# Altium PCB Karta_TETRA.PCBDOC (part 4 of 8)
Units mm, origin at the board's own origin, x right, y up, seen from the top; angles counter-clockwise.
Board outline 70 x 83.2 mm, 6 copper layers (TopLayer, Layer 1, Layer 2, Layer 3, Layer 4, Bottom Layer), stack 0.914 mm thick; 344 components, 222 nets, 1133 pads, 615 vias.
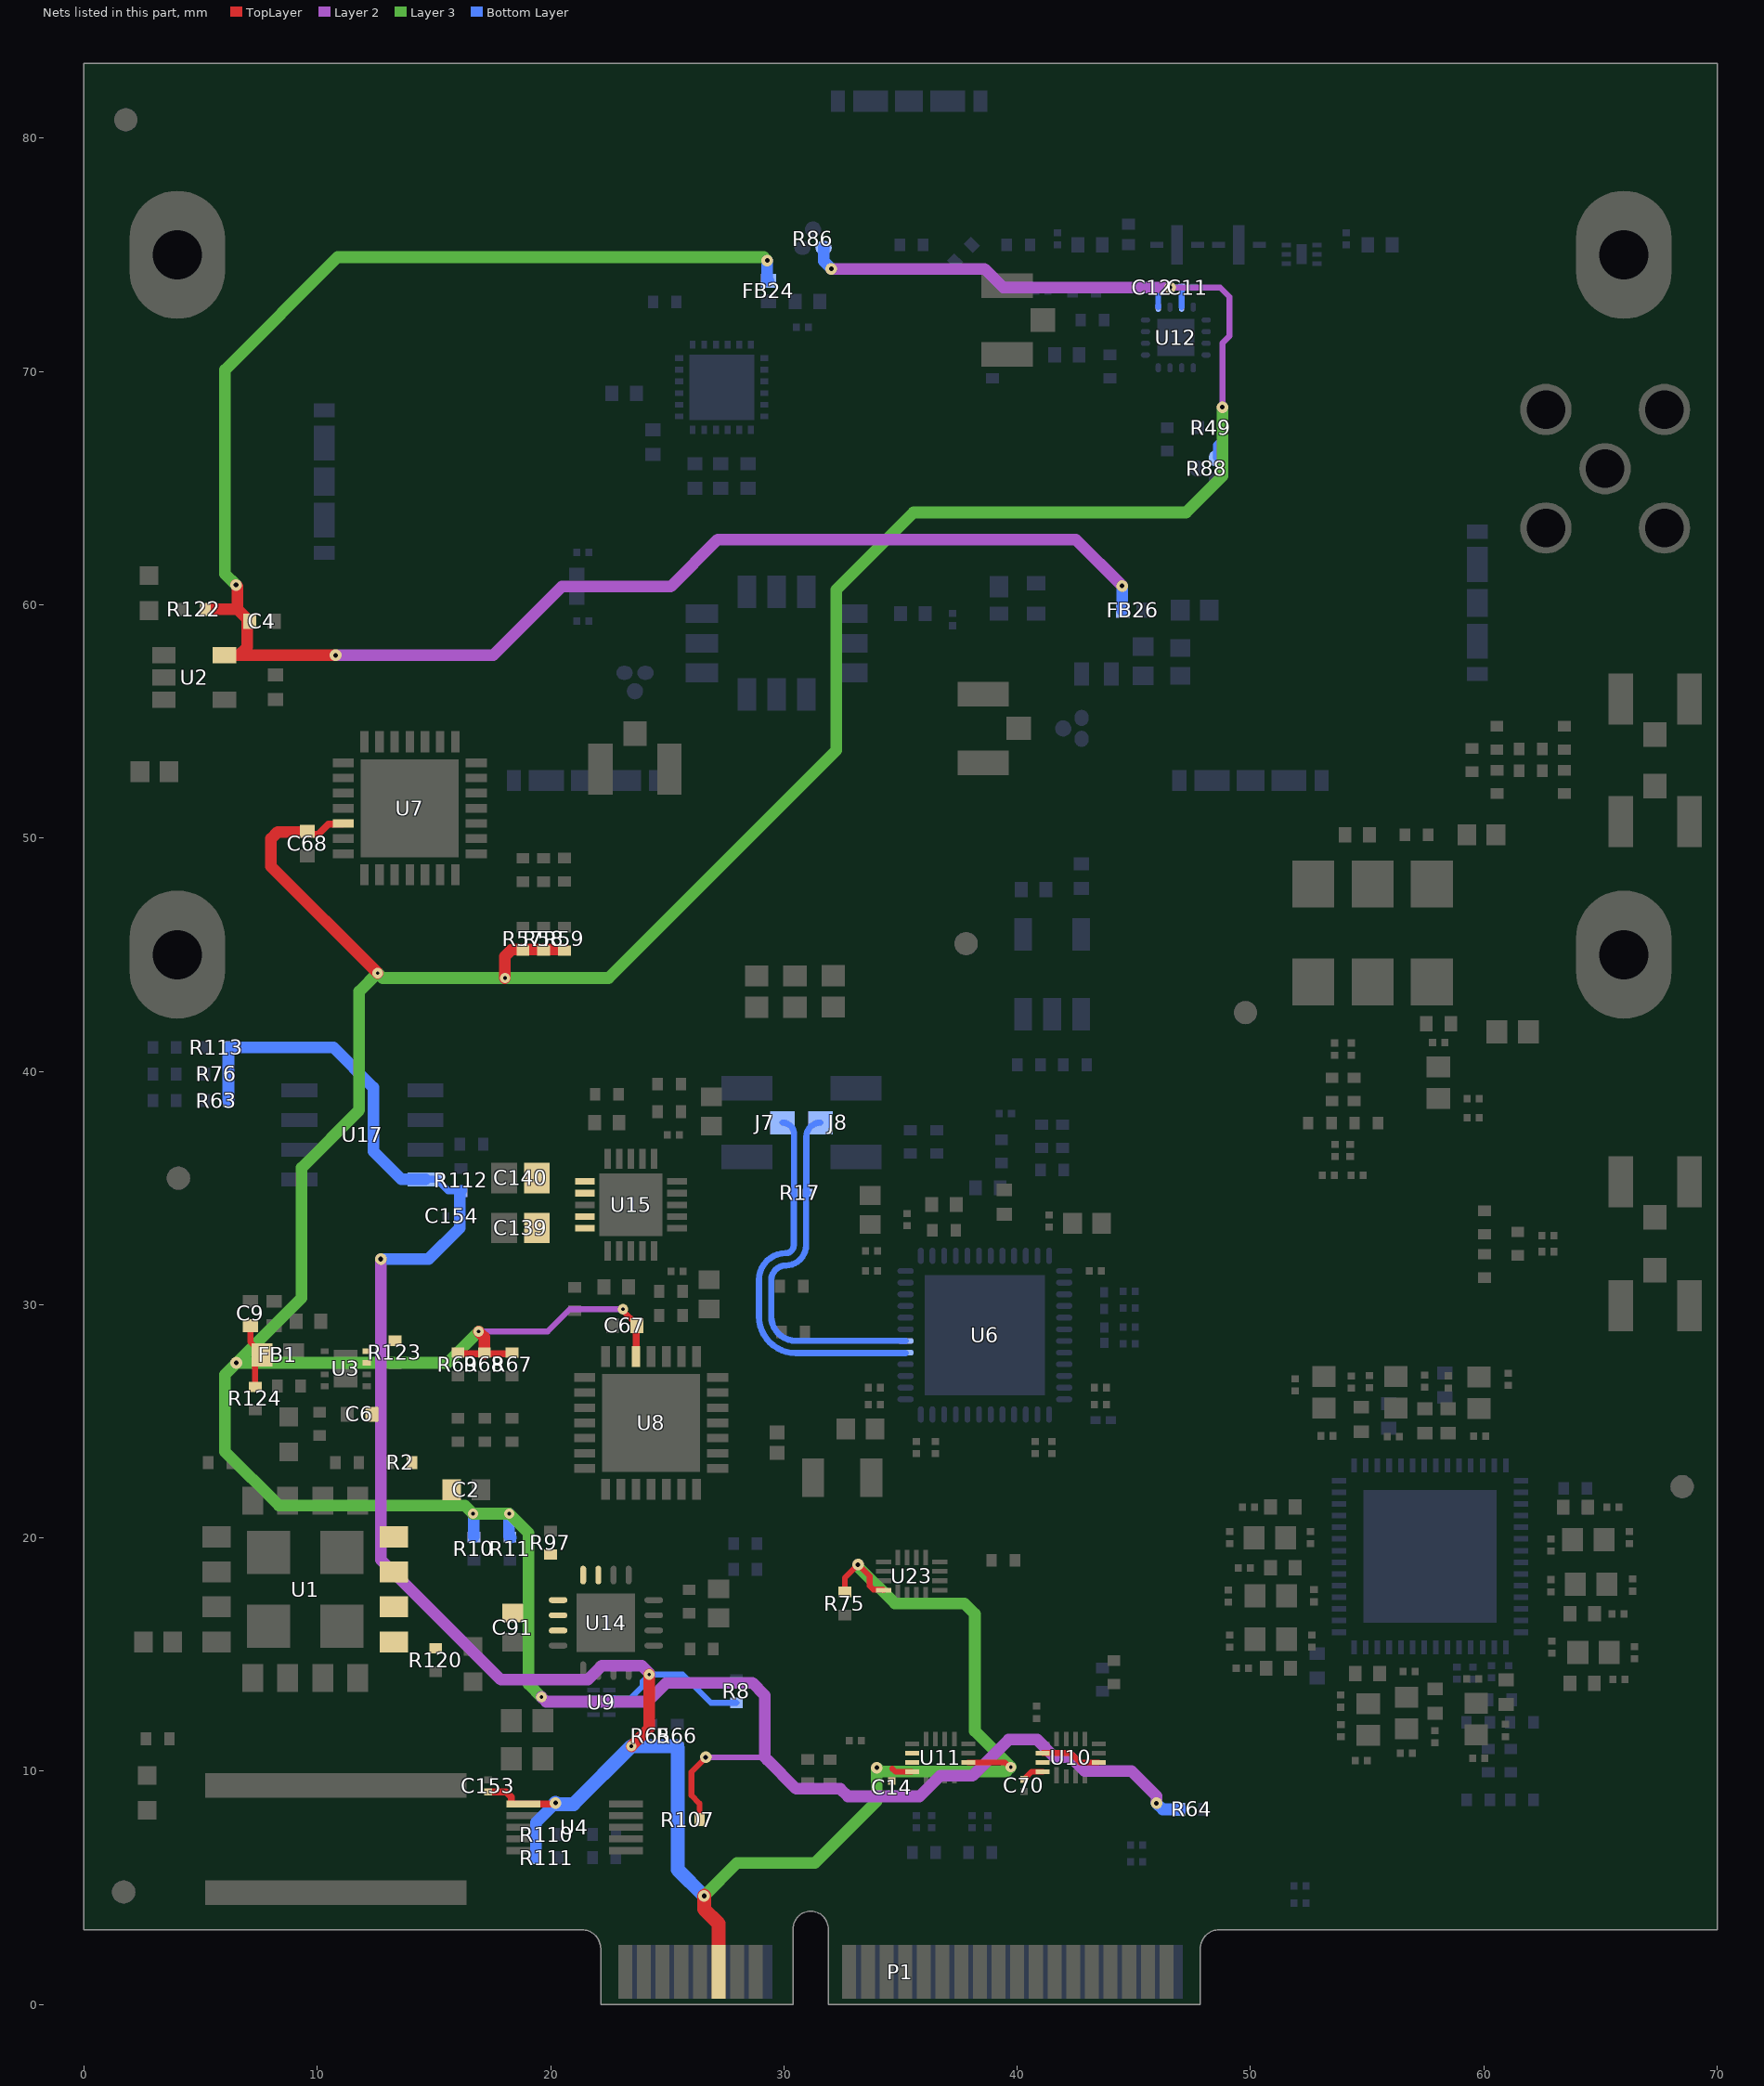
[diagram p6: the nets of this part, all layers, seen from the top]

## Part data (continued)
R99: library part Resistor, "RT Series 0402 0.063 W 38.3 kOhms 0.5% ±50 ppm/°C SMT Thin Film Chip Resistor", Case Code (Imperial)=0402, Case Code (Metric)=1005, Manufacturer=Yageo, Manufacturer Part Number=RT0402DRE0738K3L, Max Operating Temperature=155°C, Max Power Dissipation=63mW, Min Operating Temperature=-55°C, Supplier Part Number 1=311-2278-1-ND, Temperature Coefficient=50ppm/°C, Tolerance=0.5%, Voltage Rating (DC)=50V, Case/Package=0402, Category="Chip SMD Resistors", ComponentLink1Description=http://www.yageo.com/documents/recent/PYu-RT_1-to-0.01_RoHS_L_9.pdf?src-supplier=Digi-Key, ComponentLink1URL=http://www.yageo.com/documents/recent/PYu-RT_1-to-0.01_RoHS_L_9.pdf?src-supplier=Digi-Key, ComponentLink2Description=http://www.yageo.com/documents/recent/PYu-RT_1-to-0.05_RoHS_L_(4).pdf?src-supplier=Future+Electronics, ComponentLink2URL=http://www.yageo.com/documents/recent/PYu-RT_1-to-0.05_RoHS_L_(4).pdf?src-supplier=Future+Electronics, Composition="Thin Film", Features="Moisture Resistant", Height=0.014inch, Lead Free="Lead Free", Length=0.039inch, Number of Terminations=2, Packaging="Tape and Reel", Power Rating=63mW, Pricing 1="1=0,20000, 10=0,16800, 100=0,06570, 1000=0,02750, 2500=0,02521, 5000=0,02292 (USD)", Resistance=38.3kR, RoHS=Yes, Stock 1=29268, Supplier 1=Digi-Key, Width=0.02inch
R100: library part Resistor, "Thick Film Resistors - SMD 3.57K OHM 1%", Case Code (Imperial)=0402, Case Code (Metric)=1005, Manufacturer=Yageo, Manufacturer Part Number=RC0402FR-073K57L, Max Operating Temperature=155°C, Max Power Dissipation=63mW, Min Operating Temperature=-55°C, Power Rating=62.5mW, Supplier Part Number 1=YAG3150CT-ND, Temperature Coefficient=100ppm/°C, Tolerance=1%, Voltage Rating=50V, Case/Package=0402, Category="Chip SMD Resistors", ComponentLink1Description=https://datasheet.ciiva.com/16857/pyu-rc0402-51-rohs-l-6-16857623.pdf?src-supplier=Avnet+Europe, ComponentLink1URL=https://datasheet.ciiva.com/16857/pyu-rc0402-51-rohs-l-6-16857623.pdf?src-supplier=Avnet+Europe, ComponentLink2Description=https://datasheet.ciiva.com/8893/pyu-rc0402-51-rohs-l-6-8893597.pdf?src-supplier=Avnet, ComponentLink2URL=https://datasheet.ciiva.com/8893/pyu-rc0402-51-rohs-l-6-8893597.pdf?src-supplier=Avnet, Composition="Thick Film", Contact Plating=Tin,Matte, Depth=0.5mm, Features="Moisture Resistant", Height=0.016inch, Lead Free="Lead Free", Length=1mm, Military Standard=Not, Number of Terminations=2, Packaging="Tape and Reel", Pricing 1="1=0,10000, 10=0,01600, 100=0,00640, 1000=0,00289, 2500=0,00251, 5000=0,00207 (USD)", Resistance=3.57kR, RoHS=Yes, Stock 1=898047, Supplier 1=Digi-Key, Termination=SMD/SMT, Width=0.02inch, Working Voltage=50V
R101: library part Resistor, "Res General Purpose Thick Film 0402 1.15K Ohm 1% 1/16W ±100ppm/°C Molded SMD Paper T/R", Case Code (Imperial)=0402, Case Code (Metric)=1005, Manufacturer=Yageo, Manufacturer Part Number=RC0402FR-071K15L, Max Operating Temperature=155°C, Max Power Dissipation=63mW, Min Operating Temperature=-55°C, Power Rating=62.5mW, Supplier Part Number 1=YAG3033CT-ND, Temperature Coefficient=100ppm/°C, Tolerance=1%, Voltage Rating=50V, Case/Package=0402, Category="Chip SMD Resistors", ComponentLink1Description=https://datasheet.ciiva.com/16856/pyu-rc0402-51-rohs-l-6-16856533.pdf?src-supplier=Avnet+Europe, ComponentLink1URL=https://datasheet.ciiva.com/16856/pyu-rc0402-51-rohs-l-6-16856533.pdf?src-supplier=Avnet+Europe, ComponentLink2Description=https://datasheet.ciiva.com/28418/pyu-rc0402-51-rohs-l-6-28418808.pdf?src-supplier=Avnet+Europe, ComponentLink2URL=https://datasheet.ciiva.com/28418/pyu-rc0402-51-rohs-l-6-28418808.pdf?src-supplier=Avnet+Europe, ComponentLink3Description=https://datasheet.ciiva.com/8895/pyu-rc0402-51-rohs-l-6-8895884.pdf?src-supplier=Avnet, ComponentLink3URL=https://datasheet.ciiva.com/8895/pyu-rc0402-51-rohs-l-6-8895884.pdf?src-supplier=Avnet, ComponentLink4Description=https://datasheet.ciiva.com/26829/getdatasheetpartid-326427-26829948.pdf?src-supplier=Verical, ComponentLink4URL=https://datasheet.ciiva.com/26829/getdatasheetpartid-326427-26829948.pdf?src-supplier=Verical, Composition="Thick Film", Contact Plating=Tin,Matte,Lead, Depth=0.5mm, Features="Moisture Resistant", Height=0.016inch, Lead Free="Lead Free", Length=1mm, Military Standard=Not, Number of Terminations=2, Packaging="Tape and Reel", Pricing 1="1=0,10000, 10=0,01600, 100=0,00640, 1000=0,00289, 2500=0,00251, 5000=0,00207 (USD)", Radiation Hardening=No, Resistance=1.15kR, RoHS=Yes, Stock 1=186720, Supplier 1=Digi-Key, Termination=SMD/SMT, Voltage Rating (DC)=50V, Width=0.02inch
R102: library part Resistor, Case Code (Imperial)=0402, Case Code (Metric)=1005, Manufacturer=Panasonic, Manufacturer Part Number=ERA-2AEB1871X, Max Operating Temperature=155°C, Max Power Dissipation=63mW, Min Operating Temperature=-55°C, Package Quantity=10000, Power Rating=62.5mW, Supplier Part Number 1=P1.87KDCCT-ND, Temperature Coefficient=25ppm/°C, Tolerance=0.1%, Case/Package=0402, ComponentLink1Description=https://media.digikey.com/pdf/Data%20Sheets/Panasonic%20Resistors%20Thermistors%20PDFs/ERA_Series_LE.pdf?src-supplier=Digi-Key, ComponentLink1URL=https://media.digikey.com/pdf/Data%20Sheets/Panasonic%20Resistors%20Thermistors%20PDFs/ERA_Series_LE.pdf?src-supplier=Digi-Key, ComponentLink2Description=http://components.arrow.com/part/dataview/48289000S454828N1386?src-supplier=Arrow, ComponentLink2URL=http://components.arrow.com/part/dataview/48289000S454828N1386?src-supplier=Arrow, ComponentLink3Description=http://www.mouser.com/ds/2/315/AOA0000C237-1100991.pdf?src-supplier=Mouser, ComponentLink3URL=http://www.mouser.com/ds/2/315/AOA0000C237-1100991.pdf?src-supplier=Mouser, ComponentLink4Description=http://www.onlinecomponents.com/datasheet/era-2aeb1871x.aspx?p=44473586&src-supplier=Onlinecomponents.com, ComponentLink4URL=http://www.onlinecomponents.com/datasheet/era-2aeb1871x.aspx?p=44473586&src-supplier=Onlinecomponents.com, ComponentLink5Description=https://industrial.panasonic.com/cdbs/www-data/pdf/RDM0000/AOA0000C307.pdf?src-supplier=Digi-Key, ComponentLink5URL=https://industrial.panasonic.com/cdbs/www-data/pdf/RDM0000/AOA0000C307.pdf?src-supplier=Digi-Key, Composition="Thin Film", Height=0.016inch, Lead Free="Lead Free", Length=0.039inch, Mount="Surface Mount", Number of Terminations=2, Packaging="Tape and Reel", Pricing 1="1 = 0,45000, 10 = 0,32100, 100 = 0,12830, 1000 = 0,06322, 2500 = 0,05858, 5000 = 0,05300 (USD)", Resistance=1.87kR, RoHS=Yes, Stock 1=25484, Supplier 1=Digi-Key, Width=0.02inch
R103: library part Resistor, Case Code (Imperial)=0402, Case Code (Metric)=1005, Manufacturer=Panasonic, Manufacturer Part Number=ERA-2AEB152X, Max Operating Temperature=155°C, Max Power Dissipation=63mW, Min Operating Temperature=-55°C, Package Quantity=10000, Supplier Part Number 1=P1.5KDCCT-ND, Temperature Coefficient=25ppm/°C, Tolerance=0.1%, Voltage Rating=25V, Case/Package=0402, ComponentLink1Description=https://datasheet.ciiva.com/11812/0900766b80beefcc-11812726.pdf?src-supplier=RSComponents, ComponentLink1URL=https://datasheet.ciiva.com/11812/0900766b80beefcc-11812726.pdf?src-supplier=RSComponents, ComponentLink2Description=https://datasheet.ciiva.com/9198/aoa0000ce26-9198134.pdf?src-supplier=Avnet, ComponentLink2URL=https://datasheet.ciiva.com/9198/aoa0000ce26-9198134.pdf?src-supplier=Avnet, ComponentLink3Description=https://datasheet.ciiva.com/17214/aoa0000ce26-17214729.pdf?src-supplier=Avnet+Europe, ComponentLink3URL=https://datasheet.ciiva.com/17214/aoa0000ce26-17214729.pdf?src-supplier=Avnet+Europe, ComponentLink4Description=https://datasheet.ciiva.com/24071/aoa0000ce26-197354-24071641.pdf?src-supplier=Mouser, ComponentLink4URL=https://datasheet.ciiva.com/24071/aoa0000ce26-197354-24071641.pdf?src-supplier=Mouser, Composition="Thin Film,Metal Film", Contact Plating=Tin, Depth=0.5mm, Features="Automotive AEC-Q200", Height=0.35mm, Lead Free="Lead Free", Length=1mm, Military Standard=Not, Mount="Surface Mount", Number of Terminations=2, Packaging="Tape and Reel", Power Rating=63mW, Pricing 1="1 = 0,43000, 10 = 0,30500, 100 = 0,12220, 1000 = 0,06021, 2500 = 0,05579, 5000 = 0,05047 (USD)", Radiation Hardening=No, REACH SVHC="No SVHC", Resistance=1.5kR, RoHS=Yes, Stock 1=3629, Supplier 1=Digi-Key, Termination=SMD/SMT, Voltage Rating (DC)=25V, Width=0.02inch
R104 R105: library part Resistor, "RES SMD 20K OHM 1% 1/16W 0402", Case Code (Imperial)=0402, Case Code (Metric)=1005, Manufacturer=Vishay, Manufacturer Part Number=CRCW040220K0FKED, Max Operating Temperature=155°C, Max Power Dissipation=63mW, Min Operating Temperature=-55°C, Package Quantity=10, Supplier Part Number 1=51X8496, Temperature Coefficient=100ppm/°C, Tolerance=1%, Voltage Rating=50V, Case/Package=0402, Category="Chip SMD Resistors", ComponentLink1Description=https://datasheet.ciiva.com/11810/0900766b80d98824-11810023.pdf?src-supplier=RSComponents, ComponentLink1URL=https://datasheet.ciiva.com/11810/0900766b80d98824-11810023.pdf?src-supplier=RSComponents, ComponentLink2Description=https://datasheet.ciiva.com/2463/dcrcwe3-2463139.pdf?src-supplier=Digi-Key, ComponentLink2URL=https://datasheet.ciiva.com/2463/dcrcwe3-2463139.pdf?src-supplier=Digi-Key, ComponentLink3Description=https://datasheet.ciiva.com/2463/dcrcwe3-2463140.pdf?src-supplier=Digi-Key, ComponentLink3URL=https://datasheet.ciiva.com/2463/dcrcwe3-2463140.pdf?src-supplier=Digi-Key, ComponentLink4Description=https://datasheet.ciiva.com/16886/dcrcwe3-16886581.pdf?src-supplier=Avnet+Europe, ComponentLink4URL=https://datasheet.ciiva.com/16886/dcrcwe3-16886581.pdf?src-supplier=Avnet+Europe, ComponentLink5Description=https://datasheet.ciiva.com/15159/getdatasheetpartid-93312-15159927.pdf?src-supplier=Verical, ComponentLink5URL=https://datasheet.ciiva.com/15159/getdatasheetpartid-93312-15159927.pdf?src-supplier=Verical, ComponentLink6Description=https://datasheet.ciiva.com/2463/dcrcwe3-2463141.pdf?src-supplier=Digi-Key, ComponentLink6URL=https://datasheet.ciiva.com/2463/dcrcwe3-2463141.pdf?src-supplier=Digi-Key, ComponentLink7Description=https://datasheet.ciiva.com/3256/dcrcwe3-3256213.pdf?src-supplier=Avnet, ComponentLink7URL=https://datasheet.ciiva.com/3256/dcrcwe3-3256213.pdf?src-supplier=Avnet, ComponentLink8Description=https://datasheet.ciiva.com/16725/70201119-16725214.pdf?src-supplier=Allied+Electronics, ComponentLink8URL=https://datasheet.ciiva.com/16725/70201119-16725214.pdf?src-supplier=Allied+Electronics, Composition="Thick Film", Contact Plating=Tin, Depth=0.5mm, Features="Automotive AEC-Q200", Height=0.35mm, Lead Free="Lead Free", Length=1mm, Military Standard=Not, Mount="Surface Mount", Number of Pins=2, Number of Terminations=2, Packaging="Tape and Reel", Power Rating=63mW, Radiation Hardening=No, REACH SVHC=Unknown, Resistance=20kR, RoHS=Yes, Supplier 1=Newark, Termination=SMD/SMT, Voltage Rating (DC)=50V, Weight=2.3E-05oz, Width=0.5mm, Working Voltage=50V
R106: "RES SMD 5 MOHM 5W 4320 WIDE", Case/Package=Metal, Manufacturer=Ohmite, Max Operating Temperature=155°C, Max Power Dissipation=5W, Min Operating Temperature=-55°C, Package Quantity=1, Resistance=5mR, Supplier Part Number 1=FCSL110R005FERCT-ND, Temperature Coefficient=50ppm/°C, Tolerance=1%, ComponentLink1Description=https://datasheet.ciiva.com/2484/res-fcsl-2484643.pdf?src-supplier=Digi-Key, ComponentLink1URL=https://datasheet.ciiva.com/2484/res-fcsl-2484643.pdf?src-supplier=Digi-Key, ComponentLink2Description=https://datasheet.ciiva.com/2484/res-fcsl-2484644.pdf?src-supplier=Digi-Key, ComponentLink2URL=https://datasheet.ciiva.com/2484/res-fcsl-2484644.pdf?src-supplier=Digi-Key, ComponentLink3Description=https://datasheet.ciiva.com/2484/res-fcsl-2484645.pdf?src-supplier=Digi-Key, ComponentLink3URL=https://datasheet.ciiva.com/2484/res-fcsl-2484645.pdf?src-supplier=Digi-Key, ComponentLink4Description=https://datasheet.ciiva.com/6181/fcsl-6181333.pdf?src-supplier=Farnell, ComponentLink4URL=https://datasheet.ciiva.com/6181/fcsl-6181333.pdf?src-supplier=Farnell, ComponentLink5Description=https://datasheet.ciiva.com/46422/1812595-46422917.pdf?src-supplier=Element14, ComponentLink5URL=https://datasheet.ciiva.com/46422/1812595-46422917.pdf?src-supplier=Element14, ComponentLink6Description=https://datasheet.ciiva.com/8080/fcsl-8080343.pdf?src-supplier=Element14, ComponentLink6URL=https://datasheet.ciiva.com/8080/fcsl-8080343.pdf?src-supplier=Element14, Composition="Metal Foil", Depth=5mm, Features="Moisture Resistant", Height=0.028inch, Length=0.197inch, Manufacturer Part Number=FCSL110R005FER, Number of Pins=2, Number of Terminations=2, Packaging="Tape and Reel", Power Rating=5W, Pricing 1="1 = 2,79000, 10 = 2,47700, 25 = 2,29720, 50 = 2,16220, 100 = 1,89190, 250 = 1,62164, 500 = 1,35136 (USD)", REACH SVHC=Unknown, RoHS=Yes, Stock 1=3877, Supplier 1=Digi-Key, Termination=SMD/SMT, Width=11mm
R119: library part Resistor, "RES SMD 15 OHM 0.5% 1/16W 0603", Case Code (Imperial)=0603, Case Code (Metric)=1608, Manufacturer=Susumu, Manufacturer Part Number=RR0816Q-150-D, Max Operating Temperature=125°C, Max Power Dissipation=63mW, Min Operating Temperature=-55°C, Package Quantity=1, Resistor Type="Thin Film", Supplier Part Number 1=RR08Q15DCT-ND, Temperature Coefficient=50ppm/°C, Tolerance=0.5%, Voltage Rating=75V, Case/Package=0603, Category="Chip SMD Resistors", ComponentLink1Description=https://datasheet.ciiva.com/11820/0900766b80808d64-11820652.pdf?src-supplier=RSComponents, ComponentLink1URL=https://datasheet.ciiva.com/11820/0900766b80808d64-11820652.pdf?src-supplier=RSComponents, ComponentLink2Description=https://datasheet.ciiva.com/2497/rr-data-sheet-2497981.pdf?src-supplier=Digi-Key, ComponentLink2URL=https://datasheet.ciiva.com/2497/rr-data-sheet-2497981.pdf?src-supplier=Digi-Key, ComponentLink3Description=https://datasheet.ciiva.com/2497/rr-data-sheet-2497982.pdf?src-supplier=Digi-Key, ComponentLink3URL=https://datasheet.ciiva.com/2497/rr-data-sheet-2497982.pdf?src-supplier=Digi-Key, ComponentLink4Description=https://datasheet.ciiva.com/2497/rr-data-sheet-2497983.pdf?src-supplier=Digi-Key, ComponentLink4URL=https://datasheet.ciiva.com/2497/rr-data-sheet-2497983.pdf?src-supplier=Digi-Key, Depth=0.8mm, Height=0.4mm, Lead Free="Lead Free", Length=1.6mm, Number of Pins=2, Number of Terminations=2, Packaging="Tape and Reel", Power Rating=63mW, Pricing 1="1=0,10000, 10=0,09300, 100=0,03580, 1000=0,01575, 2500=0,01360 (USD)", REACH SVHC=Unknown, Resistance=15R, RoHS=Yes, Stock 1=15480, Supplier 1=Digi-Key, Termination=SMD/SMT, Voltage Rating (DC)=75V, Width=0.8mm
R120 R124: library part Resistor, "RES 560 OHM 5% 1/16W 0402", Case Code (Imperial)=0402, Case Code (Metric)=1005, Manufacturer="Stackpole Electronics", Manufacturer Part Number=RMCF0402JT560R, Max Operating Temperature=155°C, Max Power Dissipation=63mW, Min Operating Temperature=-55°C, Resistor Type="Thick Film", Supplier Part Number 1=RMCF0402JT560RCT-ND, Temperature Coefficient=100ppm/°C, Tolerance=5%, Case/Package=0402, Category="Chip SMD Resistors", ComponentLink1Description=http://components.arrow.com/part/dataview/50506686S89619N1174?src-supplier=Arrow+Electronics, ComponentLink1URL=http://components.arrow.com/part/dataview/50506686S89619N1174?src-supplier=Arrow+Electronics, ComponentLink2Description=https://www.seielect.com/catalog/SEI-Packaging.pdf?src-supplier=Digi-Key, ComponentLink2URL=https://www.seielect.com/catalog/SEI-Packaging.pdf?src-supplier=Digi-Key, ComponentLink3Description=http://www.seielect.com/Catalog/SEI-rmc.pdf?src-supplier=Future+Electronics, ComponentLink3URL=http://www.seielect.com/Catalog/SEI-rmc.pdf?src-supplier=Future+Electronics, ComponentLink4Description=https://www.seielect.com/catalog/SEI-RMCF_RMCP.pdf?src-supplier=Avnet, ComponentLink4URL=https://www.seielect.com/catalog/SEI-RMCF_RMCP.pdf?src-supplier=Avnet, Contact Plating=Tin,Matte, Features="Automotive AEC-Q200", Height=0.016inch, Lead Free="Lead Free", Length=0.039inch, Mount="Surface Mount", Number of Terminations=2, Packaging="Tape and Reel", Power Rating=63mW, Pricing 1="1=0,10000, 10=0,01000, 100=0,00410, 1000=0,00186, 2500=0,00161, 5000=0,00133 (USD)", Radiation Hardening=No, Resistance=560R, RoHS=Yes, Stock 1=65817, Supplier 1=Digi-Key, Width=0.02inch
T2: Case/Package=SMD/SMT, Manufacturer="TE Connectivity MA-COM", Max DC Current=30mA, Max Operating Temperature=85°C, Min Operating Temperature=-40°C, Package Quantity=2000, Power Rating=250mW, Supplier Part Number 1=937-MABA007159000000, ComponentLink1Description=https://datasheet.ciiva.com/3295/maba-007159-000000-3295941.pdf?src-supplier=Avnet, ComponentLink1URL=https://datasheet.ciiva.com/3295/maba-007159-000000-3295941.pdf?src-supplier=Avnet, ComponentLink2Description=https://datasheet.ciiva.com/4550/maba-007159-000000-13414-4550885.pdf?src-supplier=Mouser, ComponentLink2URL=https://datasheet.ciiva.com/4550/maba-007159-000000-13414-4550885.pdf?src-supplier=Mouser, ComponentLink3Description=https://datasheet.ciiva.com/29655/maba-007159-000000-29655720.pdf?src-supplier=Digi-Key, ComponentLink3URL=https://datasheet.ciiva.com/29655/maba-007159-000000-29655720.pdf?src-supplier=Digi-Key, ComponentLink4Description=https://datasheet.ciiva.com/29655/maba-007159-000000-29655722.pdf?src-supplier=Digi-Key, ComponentLink4URL=https://datasheet.ciiva.com/29655/maba-007159-000000-29655722.pdf?src-supplier=Digi-Key, Depth=3.81mm, Height=2.67mm, Lead Free="Lead Free", Lead/Base Style="Gull Wing", Length=3.81mm, Manufacturer Part Number=MABA-007159-000000, Mount="Surface Mount", Number of Pins=5, Packaging="Tape and Reel", Pricing 1="1 = 1,75000, 10 = 1,41000, 50 = 1,41000, 100 = 1,13000, 1000 = 0,88000, 10000 = 0,68800 (USD)", Radiation Hardening=No, RoHS=Yes, Stock 1=6455, Supplier 1=Mouser, Termination=SMD/SMT, Turns Ratio=1:1, Width=3.81mm
U1: library part 171031801, "DC DC CONVERTER 0.8V-17V", Input Voltage=4-18V, Manufacturer="Wurth Elektronik", Max Input Voltage=18V, Max Operating Temperature=85°C, Max Output Current=3A, Min Input Voltage=4V, Min Operating Temperature=-40°C, Operating Temperature="-40 to +125degC", Output Voltage=0.8-17V, Supplier Part Number 1=732-12297-1-ND, Voltage - Output 1=17V, Category="Board Mount Modules", ComponentLink1Description=Manufacturer, ComponentLink1URL=http://www.we-online.de, ComponentLink2Description=Datasheet, ComponentLink2URL=https://katalog.we-online.de/pm/datasheet/171031801.pdf, ComponentLink3Description=https://katalog.we-online.de/pm/datasheet/171031801.pdf?src-supplier=Digi-Key, ComponentLink3URL=https://katalog.we-online.de/pm/datasheet/171031801.pdf?src-supplier=Digi-Key, Efficiency=95%, Features=UVLO,OCP,OTP,SCP, Manufacturer Part Number=171031801, Mount="Surface Mount", Mounting Technology=SMT, Number of Outputs=1, Output Current=3A, Packaging="Tape and Reel", Pricing 1="1=9,28000, 10=8,53900, 50=8,00360 (USD)", Published Date="April 2020", RoHS=No, Size=LGA-16EP, Stock 1=530, Supplier 1=Digi-Key
U2: "IC REG LINEAR 5V 300MA SOT23-5", Case/Package=SOT-23-5, Dropout Voltage=250mV, Manufacturer=Diodes, Max Input Voltage=13.2V, Max Operating Temperature=125°C, Max Output Current=300mA, Min Input Voltage=2.5V, Min Operating Temperature=-40°C, Output Voltage=5V, Package Quantity=3000, Power Supply Rejection Ratio (PSRR)=75dB, Quiescent Current=150uA, Supplier Part Number 1=AP2210K-5.0TRG1DICT-ND, Accuracy=1%, Category="Voltage Regulators - Linear", ComponentLink1Description=https://datasheet.ciiva.com/29569/ap2210-29569974.pdf?src-supplier=Digi-Key, ComponentLink1URL=https://datasheet.ciiva.com/29569/ap2210-29569974.pdf?src-supplier=Digi-Key, ComponentLink2Description=https://datasheet.ciiva.com/29569/ap2210-29569975.pdf?src-supplier=Digi-Key, ComponentLink2URL=https://datasheet.ciiva.com/29569/ap2210-29569975.pdf?src-supplier=Digi-Key, ComponentLink3Description=https://datasheet.ciiva.com/29569/ap2210-29569976.pdf?src-supplier=Digi-Key, ComponentLink3URL=https://datasheet.ciiva.com/29569/ap2210-29569976.pdf?src-supplier=Digi-Key, Lead Free="Lead Free", Manufacturer Part Number=AP2210K-5.0TRG1, Mount="Surface Mount", Number of Outputs=1, Number of Pins=5, Number of Regulators=1, Output Current=300mA, Output Type=Fixed, Packaging="Tape and Reel", Polarity=Positive, Pricing 1="1=0,42000, 10=0,34200, 25=0,31280, 100=0,21090, 250=0,17452, 500=0,15998, 1000=0,11999 (USD)", RoHS=Yes, Stock 1=36767, Supplier 1=Digi-Key, Weight=0.001058oz
U3: "IC REG LIN POS ADJ 500MA 8LFCSP", Case/Package=MSOP, Dropout Voltage=130mV, Manufacturer="Analog Devices", Max Input Voltage=5.5V, Max Operating Temperature=125°C, Max Output Current=500mA, Max Output Voltage=5V, Max Supply Current=210uA, Min Current Limit=550mA, Min Input Voltage=2.3V, Min Operating Temperature=-40°C, Min Output Voltage=800mV, Nominal Supply Current=45uA, Power Supply Rejection Ratio (PSRR)=60dB, Reference Voltage=500mV, Supplier Part Number 1=2457144, Accuracy=1%, ComponentLink1Description=https://datasheet.ciiva.com/17365/adp124-125-17365589.pdf?src-supplier=Avnet+Europe, ComponentLink1URL=https://datasheet.ciiva.com/17365/adp124-125-17365589.pdf?src-supplier=Avnet+Europe, ComponentLink2Description=https://datasheet.ciiva.com/2056/adp124-125-2056955.pdf?src-supplier=Digi-Key, ComponentLink2URL=https://datasheet.ciiva.com/2056/adp124-125-2056955.pdf?src-supplier=Digi-Key, ComponentLink3Description=https://datasheet.ciiva.com/2056/adp124-125-2056954.pdf?src-supplier=Digi-Key, ComponentLink3URL=https://datasheet.ciiva.com/2056/adp124-125-2056954.pdf?src-supplier=Digi-Key, ComponentLink4Description=https://datasheet.ciiva.com/2056/adp124-125-2056956.pdf?src-supplier=Digi-Key, ComponentLink4URL=https://datasheet.ciiva.com/2056/adp124-125-2056956.pdf?src-supplier=Digi-Key, ComponentLink5Description=https://datasheet.ciiva.com/48694/001251247-da-01-en-ic-reg-l-adj-adp125acpz-r7-lfcspud-8-adi-48694599.pdf?src-supplier=Conrad, ComponentLink5URL=https://datasheet.ciiva.com/48694/001251247-da-01-en-ic-reg-l-adj-adp125acpz-r7-lfcspud-8-adi-48694599.pdf?src-supplier=Conrad, ComponentLink6Description=http://datasheet.octopart.com/ADP125ACPZ-R7-Analog-Devices-datasheet-11525030.pdf?src-supplier=Newark, ComponentLink6URL=http://datasheet.octopart.com/ADP125ACPZ-R7-Analog-Devices-datasheet-11525030.pdf?src-supplier=Newark, ComponentLink7Description=http://datasheet.octopart.com/ADP125ACPZ-R7-Analog-Devices-datasheet-38878834.pdf?src-supplier=Newark, ComponentLink7URL=http://datasheet.octopart.com/ADP125ACPZ-R7-Analog-Devices-datasheet-38878834.pdf?src-supplier=Newark, ComponentLink8Description=http://datasheet.octopart.com/ADP125ACPZ-R7-Analog-Devices-datasheet-10623001.pdf?src-supplier=Analog+Devices, ComponentLink8URL=http://datasheet.octopart.com/ADP125ACPZ-R7-Analog-Devices-datasheet-10623001.pdf?src-supplier=Analog+Devices, ComponentLink9Description=http://datasheet.octopart.com/ADP125ACPZ-R7-Analog-Devices-datasheet-8638579.pdf?src-supplier=Analog+Devices, ComponentLink9URL=http://datasheet.octopart.com/ADP125ACPZ-R7-Analog-Devices-datasheet-8638579.pdf?src-supplier=Analog+Devices, ComponentLink10Description=http://datasheet.octopart.com/ADP125ACPZ-R7-Analog-Devices-datasheet-11776558.pdf?src-supplier=Arrow, ComponentLink10URL=http://datasheet.octopart.com/ADP125ACPZ-R7-Analog-Devices-datasheet-11776558.pdf?src-supplier=Arrow, Contact Plating=Gold, Height=0.6mm, Lead Free="Contains Lead", Length=2mm, Manufacturer 2="Analog Devices", Manufacturer Part Number=ADP125ACPZ-R7, Manufacturer Part Number 2=ADP125ACPZ-R7, Number of Outputs=1, Number of Pins=8, Number of Regulators=1, Operating Supply Current=45uA, Output Current=500mA, Output Type=Adjustable, Output Voltage=5V, Packaging="Tape and Reel", Polarity=Positive, Pricing 2="1=1.39000, 10=1.23900, 25=1.17600, 100=0.96600, 250=0.90300, 500=0.79800, 1000=0.63000 (USD)", Quiescent Current=45uA, REACH SVHC="No SVHC", RoHS=Yes, Stock 1=261, Stock 2=12322, Supplier 1=Farnell, Supplier 2=Digi-Key, Supplier Part Number 2=ADP125ACPZ-R7CT-ND, Width=2mm
U4: "IC MONITOR PWR/CURR BIDIR 10MSOP", Case/Package=VSSOP, Input Bias Current=10uA, Input Offset Voltage (Vos)=2.5uV, Manufacturer="Texas Instruments", Max Operating Temperature=125°C, Max Supply Voltage=5.5V, Min Operating Temperature=-40°C, Min Supply Voltage=2.7V, Nominal Supply Current=330uA, Output Current=10mA, Package Quantity=1, Supplier Part Number 1=296-29034-1-ND, Accuracy=0.02%, Common Mode Rejection Ratio=140dB, ComponentLink1Description=https://datasheet.ciiva.com/1939/ina226-1939633.pdf?src-supplier=Digi-Key, ComponentLink1URL=https://datasheet.ciiva.com/1939/ina226-1939633.pdf?src-supplier=Digi-Key, ComponentLink2Description=https://datasheet.ciiva.com/4875/sbos547-126280-4875559.pdf?src-supplier=Mouser, ComponentLink2URL=https://datasheet.ciiva.com/4875/sbos547-126280-4875559.pdf?src-supplier=Mouser, ComponentLink3Description=https://datasheet.ciiva.com/1939/ina226-1939634.pdf?src-supplier=Digi-Key, ComponentLink3URL=https://datasheet.ciiva.com/1939/ina226-1939634.pdf?src-supplier=Digi-Key, ComponentLink4Description=https://datasheet.ciiva.com/1939/ina226-1939635.pdf?src-supplier=Digi-Key, ComponentLink4URL=https://datasheet.ciiva.com/1939/ina226-1939635.pdf?src-supplier=Digi-Key, ComponentLink5Description=https://datasheet.ciiva.com/14196/ina226-14196741.pdf?src-supplier=Avnet, ComponentLink5URL=https://datasheet.ciiva.com/14196/ina226-14196741.pdf?src-supplier=Avnet, ComponentLink6Description=https://datasheet.ciiva.com/22693/1840205-22693516.pdf?src-supplier=Element14, ComponentLink6URL=https://datasheet.ciiva.com/22693/1840205-22693516.pdf?src-supplier=Element14, Contact Plating=Gold, Lead Free="Lead Free", Manufacturer Part Number=INA226AIDGSR, Mount="Surface Mount", Number of Pins=10, Packaging="Tape and Reel", Pricing 1="1 = 2,88000, 10 = 2,58900, 100 = 2,12100, 500 = 1,80554, 1000 = 1,52275 (USD)", Radiation Hardening=No, REACH SVHC="No SVHC", RoHS=Yes, Stock 1=62024, Supplier 1=Digi-Key
U5: Case/Package=QFN, Manufacturer="Texas Instruments", Max Frequency=6.175GHz, Max Operating Temperature=85°C, Min Operating Temperature=-40°C, Supplier Part Number 1=296-51339-1-ND, Category="Clock Generators, PLLs, Frequency Synthesizers", ComponentLink1Description=http://www.ti.com/lit/ds/symlink/lmk04610.pdf?src-supplier=Digi-Key, ComponentLink1URL=http://www.ti.com/lit/ds/symlink/lmk04610.pdf?src-supplier=Digi-Key, Input=LVCMOS, Manufacturer Part Number=LMK04610RTQR, Mount="Surface Mount", Number of Circuits=1, Number of Inputs=2, Number of Outputs=10, Packaging="Tape and Reel", PLL=Yes, Pricing 1="1 = 20,47000, 10 = 18,87700, 100 = 16,11940, 500 = 14,63474 (USD)", Pricing 2="1=32,35000, 10=29,84000, 25=28,49880, 100=25,48130 (USD)", RoHS=No, Stock 1=2022, Stock 2=150, Supplier 1=Digi-Key, Supplier 2=Digi-Key, Supplier Part Number 2=296-48594-1-ND
U6: "IC ADC 14BIT 170MSPS 48QFN", Case/Package=QFN, Manufacturer="Analog Devices / Linear Technology", Max Operating Temperature=85°C, Max Supply Voltage=1.9V, Min Operating Temperature=-40°C, Min Supply Voltage=1.7V, Supplier Part Number 1=LTC2122IUK#PBF-ND, Category="Analog to Digital Converters (ADCs)", ComponentLink1Description=http://www.linear.com/docs/45350?src-supplier=Digi-Key, ComponentLink1URL=http://www.linear.com/docs/45350?src-supplier=Digi-Key, ComponentLink2Description=http://www.farnell.com/datasheets/1968213.pdf?src-supplier=Element14, ComponentLink2URL=http://www.farnell.com/datasheets/1968213.pdf?src-supplier=Element14, Interface=SPI, Manufacturer Part Number=LTC2122IUK#PBF, Number of A/D Converters=2, Number of Bits=14, Number of Inputs=2, Number of Pins=48, Packaging=Tray, Pricing 1="1=105,29000, 25=102,14040 (USD)", REACH SVHC="No SVHC", Resolution=14b, RoHS=Yes, Sampling Rate=170000000S/s, Stock 1=52, Supplier 1=Digi-Key
U7 U8: "IC I/O EXPANDER I2C 16B 28QFN", Case/Package=QFN, Frequency=1.7MHz, Manufacturer=Microchip, Max Operating Temperature=125°C, Min Operating Temperature=-40°C, Operating Supply Voltage=5.5V, Output Current=25mA, Package Quantity=1600, Power Dissipation=700mW, Supplier Part Number 1=MCP23017T-E/MLCT-ND, ComponentLink1Description=https://datasheet.ciiva.com/1780/21952b-1780757.pdf?src-supplier=Digi-Key, ComponentLink1URL=https://datasheet.ciiva.com/1780/21952b-1780757.pdf?src-supplier=Digi-Key, ComponentLink2Description=https://datasheet.ciiva.com/16454/filehandler-aspxddocname-en023709-16454263.pdf?src-supplier=Future+Electronics, ComponentLink2URL=https://datasheet.ciiva.com/16454/filehandler-aspxddocname-en023709-16454263.pdf?src-supplier=Future+Electronics, ComponentLink3Description=https://datasheet.ciiva.com/8128/21952b-8128584.pdf?src-supplier=Avnet, ComponentLink3URL=https://datasheet.ciiva.com/8128/21952b-8128584.pdf?src-supplier=Avnet, Contact Plating=Tin,Matte, Interface=I2C,Serial, Lead Free="Lead Free", Manufacturer Part Number=MCP23017T-E/ML, Max Frequency=1.7MHz, Number of Bits=16, Number of I/Os=16, Packaging="Tape and Reel", Pricing 1="1 = 1,45000, 25 = 1,21560, 100 = 1,10210 (USD)", RoHS=Yes, Stock 1=7016, Supplier 1=Digi-Key
U9: "TEXAS INSTRUMENTS   PCA9306DQER.   IC, SMBus, 5V, X2SON-8", Low Level Output Current=128mA, Manufacturer 1="Texas Instruments", Max Operating Temperature=85°C, Max Supply Voltage=5V, Min Operating Temperature=-40°C, Min Supply Voltage=0uV, Package Quantity=1, Supplier Part Number 1=296-27957-1-ND, ComponentLink1Description=https://datasheet.ciiva.com/22631/1719693-22631024.pdf?src-supplier=Element14, ComponentLink1URL=https://datasheet.ciiva.com/22631/1719693-22631024.pdf?src-supplier=Element14, ComponentLink2Description=https://datasheet.ciiva.com/1899/pca9306-1899328.pdf?src-supplier=Digi-Key, ComponentLink2URL=https://datasheet.ciiva.com/1899/pca9306-1899328.pdf?src-supplier=Digi-Key, ComponentLink3Description=https://datasheet.ciiva.com/15095/getdatasheetpartid-306496-15095555.pdf?src-supplier=Verical, ComponentLink3URL=https://datasheet.ciiva.com/15095/getdatasheetpartid-306496-15095555.pdf?src-supplier=Verical, ComponentLink4Description=https://datasheet.ciiva.com/1504/1862428-1504149.pdf?src-supplier=Element14, ComponentLink4URL=https://datasheet.ciiva.com/1504/1862428-1504149.pdf?src-supplier=Element14, ComponentLink5Description=https://datasheet.ciiva.com/1899/pca9306-1899326.pdf?src-supplier=Digi-Key, ComponentLink5URL=https://datasheet.ciiva.com/1899/pca9306-1899326.pdf?src-supplier=Digi-Key, ComponentLink6Description=https://datasheet.ciiva.com/14287/pca9306-14287374.pdf?src-supplier=Avnet, ComponentLink6URL=https://datasheet.ciiva.com/14287/pca9306-14287374.pdf?src-supplier=Avnet, ComponentLink7Description=https://datasheet.ciiva.com/14287/pca9306-14287470.pdf?src-supplier=Avnet, ComponentLink7URL=https://datasheet.ciiva.com/14287/pca9306-14287470.pdf?src-supplier=Avnet, ComponentLink8Description=https://datasheet.ciiva.com/1899/pca9306-1899327.pdf?src-supplier=Digi-Key, ComponentLink8URL=https://datasheet.ciiva.com/1899/pca9306-1899327.pdf?src-supplier=Digi-Key, ComponentLink9Description=https://datasheet.ciiva.com/26041/pca9306-26041014.pdf?src-supplier=Avnet+Europe, ComponentLink9URL=https://datasheet.ciiva.com/26041/pca9306-26041014.pdf?src-supplier=Avnet+Europe, Height=0.35mm, Lead Free="Lead Free", Length=1.45mm, Logic Function=Translator, Manufacturer Part Number 1=PCA9306DQER, Number of Bits=2, Number of Channels=2, Number of Outputs=2, Number of Pins=8, Output Type=I2C, Packaging="Tape and Reel", Pricing 1="1=0,67000, 10=0,59100, 100=0,45340, 500=0,35844, 1000=0,28675 (USD)", Propagation Delay=0.3ns, Radiation Hardening=No, REACH SVHC="No SVHC", RoHS=Yes, Stock 1=25002, Supplier 1=Digi-Key, Turn-On Delay Time=1.4ns, Width=1.05mm
U10 U11: "4-bit dual-supply bus transceiver with 3-state outputs and independent direction control inputs 16-UQFN -40 to 125", Manufacturer="Texas Instruments", Supplier Part Number 1=296-SN74AXC4T774RSVRCT-ND, Category="Buffers, Drivers and Transceivers", Manufacturer Part Number=SN74AXC4T774RSVR, Pricing 1="1=1,21000, 10=1,08600, 25=1,03040, 100=0,84640, 250=0,79120, 500=0,69920, 1000=0,55200 (USD)", RoHS=No, Stock 1=2179, Supplier 1=Digi-Key
U12: "RF Detector 0MHz to 6000MHz 16-Pin LFCSP EP T/R", Manufacturer="Analog Devices", Operating Supply Current=4mA, Supplier Part Number 1=ADL5910ACPZN-R7CT-ND, Category="RF Semiconductors and Devices", ComponentLink1Description=https://www.analog.com/media/en/technical-documentation/data-sheets/ADL5910.pdf?src-supplier=Digi-Key, ComponentLink1URL=https://www.analog.com/media/en/technical-documentation/data-sheets/ADL5910.pdf?src-supplier=Digi-Key, Manufacturer Part Number=ADL5910ACPZN-R7, Number of Pins=16, Packaging="Cut Tape", Pricing 1="1=5,17000, 10=4,64100, 25=4,38760, 100=3,80250, 250=3,60752, 500=3,23700 (USD)", RoHS=No, Stock 1=1503, Supplier 1=Digi-Key
U14: "2 A, Low VIN, Low Dropout Linear Regulator, 1.6 to 3.6 V Vin, 0.75 to 3 V Vout, Industrial, 16-pin QFN (CP-16-13), Reel", Manufacturer="Analog Devices", Supplier Part Number 1=ADP1741ACPZ-R7TR-ND, Supply Current IGND @ Small Load=90uA, Code_JEDEC=MO-220-VGGC., ComponentLink1Description="Manufacturer URL", ComponentLink1URL=http://www.analog.com/en/index.html, ComponentLink2Description=Datasheet, ComponentLink2URL=http://www.analog.com/static/imported-files/data_sheets/ADP1740_1741.pdf, ComponentLink3Description="Package Specification", ComponentLink3URL=http://www.analog.com/static/imported-files/packages/PKG_PDF/LFCSP(CP)/CP-16/CP_16_13.pdf, ComponentLink4Description="URL Link1", ComponentLink4URL="Product URL:http://www.analog.com/en/ADP1741/productSearch.html", DatasheetVersion="Rev. D", Iout max=2A, Mounting Technology="Surface Mount", PackageDescription="16-Pin Lead Frame Chip Scale Package, Body 4 x 4 mm, Pitch 0.65 mm", PackageReference=CP-16-13, PackageVersion="031006-A, 06/2006", Packing=Reel, PartNumber=ADP1741ACPZ-R7, Supplier 1=Digi-Key, Supplier 2=Digi-Key, Supplier 3=Digi-Key, Supplier 4=Newark, Supplier 5=Newark, Supplier 6=Mouser, Supplier Part Number 2=ADP1741ACPZ-R7CT-ND, Supplier Part Number 3=ADP1741ACPZ-R7DKR-ND, Supplier Part Number 4=72W4083, Supplier Part Number 5=34P3050, Supplier Part Number 6=584-ADP1741ACPZ-R7, Vin (max) (V)=3.6, Vin (min) (V)=1.6, Vout Adjustable Range="0.75V to 3.3V"
U15: "IC REG LINEAR POS ADJ 1A 20QFN", Case/Package=QFN, Dropout Voltage=130mV, Manufacturer="Texas Instruments", Max Operating Temperature=125°C, Min Current Limit=1.5A, Min Operating Temperature=-40°C, Output Current=1A, Output Voltage=5V, Quiescent Current=2mA, Supplier Part Number 1=296-43312-1-ND, Category="Voltage References", ComponentLink1Description=http://www.ti.com/lit/gpn/tps7a88?src-supplier=Mouser, ComponentLink1URL=http://www.ti.com/lit/gpn/tps7a88?src-supplier=Mouser, ComponentLink2Description=http://www.ti.com/lit/ds/symlink/tps7a88.pdf?src-supplier=Digi-Key, ComponentLink2URL=http://www.ti.com/lit/ds/symlink/tps7a88.pdf?src-supplier=Digi-Key, ComponentLink3Description=http://www.ti.com/general/docs/lit/getliterature.tsp?genericPartNumber=TPS7A88&amp;&amp;fileType=pdf&src-supplier=Farnell, ComponentLink3URL=http://www.ti.com/general/docs/lit/getliterature.tsp?genericPartNumber=TPS7A88&amp;&amp;fileType=pdf&src-supplier=Farnell, Lead Free="Lead Free", Manufacturer Part Number=TPS7A8801RTJT, Mount="Surface Mount", Number of Outputs=2, Number of Pins=20, Number of Regulators=2, Packaging="Tape and Reel", Pricing 1="1=2,77000, 10=2,48700, 25=2,34600, 100=1,87670 (USD)", RoHS=Yes, Stock 1=1455, Supplier 1=Digi-Key
U17: "Microchip 24LC32AT-I/SN Serial EEPROM Memory, 32kbit, 1000ns, 2.5  5.5 V 8-Pin SOIC", Case/Package=SOIC, Frequency=400kHz, Manufacturer=Microchip, Max Operating Temperature=85°C, Max Supply Voltage=5.5V, Min Operating Temperature=-40°C, Min Supply Voltage=2.5V, Nominal Supply Current=3mA, Package Quantity=3300, Supplier Part Number 1=24LC32AT-I/SNCT-ND, Access Time=900ns, Category=EEPROM, ComponentLink1Description=https://datasheet.ciiva.com/1165/1669362-1165104.pdf?src-supplier=Newark, ComponentLink1URL=https://datasheet.ciiva.com/1165/1669362-1165104.pdf?src-supplier=Newark, ComponentLink2Description=https://datasheet.ciiva.com/15123/getdatasheetpartid-768552-15123863.pdf?src-supplier=Verical, ComponentLink2URL=https://datasheet.ciiva.com/15123/getdatasheetpartid-768552-15123863.pdf?src-supplier=Verical, ComponentLink3Description=https://datasheet.ciiva.com/14134/24aa32a-24lc32a-eng-tds-14134838.pdf?src-supplier=Distrelec, ComponentLink3URL=https://datasheet.ciiva.com/14134/24aa32a-24lc32a-eng-tds-14134838.pdf?src-supplier=Distrelec, ComponentLink4Description=https://datasheet.ciiva.com/8059/1669362-8059144.pdf?src-supplier=Element14, ComponentLink4URL=https://datasheet.ciiva.com/8059/1669362-8059144.pdf?src-supplier=Element14, ComponentLink5Description=https://datasheet.ciiva.com/3184/21713l-3184953.pdf?src-supplier=Avnet, ComponentLink5URL=https://datasheet.ciiva.com/3184/21713l-3184953.pdf?src-supplier=Avnet, ComponentLink6Description=https://datasheet.ciiva.com/17651/21713l-17651374.pdf?src-supplier=Avnet+Europe, ComponentLink6URL=https://datasheet.ciiva.com/17651/21713l-17651374.pdf?src-supplier=Avnet+Europe, Contact Plating=Tin,Matte, Density=32Kb, Height=1.5mm, Interface=I2C,Serial,2-Wire, Lead Free="Lead Free", Length=4.9mm, Manufacturer Part Number=24LC32AT-I/SN, Max Frequency=400kHz, Memory Size=32Kb, Memory Type=EEPROM, Mount="Surface Mount", Number of Pins=8, Number of Words=4, Packaging="Tape and Reel", Pricing 1="1=0,34000, 25=0,33000, 100=0,31000 (USD)", Radiation Hardening=No, REACH SVHC="No SVHC", RoHS=Yes, Stock 1=9460, Supplier 1=Digi-Key, Width=3.9mm
U18: "Silicon Germanium Broadband MMIC Amplifier, DC-6 GHz, 17.5 dB Gain, SOT343, Green", Frequency (f)="DC-6 GHz", Manufacturer=Infineon, Supplier Part Number 1=N/A, ComponentLink1Description="Manufacturer URL", ComponentLink1URL=http://www.infineon.com/, ComponentLink2Description=Datasheet, ComponentLink2URL=http://www.infineon.com/dgdl/BGA616.pdf?folderId=db3a30431441fb5d0114b654e6581730&fileId=db3a304314dca3890115419102bb163b&location=en.Products.RF.RF_MMIC.CATV___Broadband_Amplifier.DATASHEET.BGA616.pdf, ComponentLink3Description="Package Specification", ComponentLink3URL=http://www.infineon.com/dgdl/SOT343-Package_Overview.pdf?folderId=db3a30431936bc4b0119535155343cba&fileId=db3a30431936bc4b0119535a9f393cd3, DatasheetVersion="Rev. 2.1", F (typ)="2.9 dB", Gain (typ)="17.5 dB", Green=yes, Halogen-free=yes, I (typ)="60 mA", Mounting Technology="Surface Mount", P-1dB (in)=+18, PackageDescription="4-Pin Small Outline Transistor Package, 1.25 x 2 mm Body", PackageReference=SOT343, PartNumber=BGA616, Supplier 1=Mouser, Supplier 2=Digi-Key, Supplier Part Number 2=BGA616H6327XTSA1CT-ND
U22: "ANALOG DEVICES   HMC472ALP4E   RF ATTENUATOR, 3.8GHZ, 5.5V, HQFN-24", Attenuation Value=31.5dB, Case/Package=SMD/SMT, Manufacturer="Analog Devices", Max Frequency=3.8GHz, Max Input Voltage=5.5V, Max Operating Temperature=85°C, Max Power Dissipation=560mW, Min Input Voltage=4.5V, Min Operating Temperature=-40°C, Operating Supply Voltage=5V, Package Quantity=50, Supplier Part Number 1=1127-3157-ND, ComponentLink1Description=http://www.mouser.com/ds/2/609/hmc472a-879296.pdf?src-supplier=Mouser, ComponentLink1URL=http://www.mouser.com/ds/2/609/hmc472a-879296.pdf?src-supplier=Mouser, ComponentLink2Description=http://www.analog.com/media/en/technical-documentation/data-sheets/hmc472a.pdf?src-supplier=Avnet+Asia, ComponentLink2URL=http://www.analog.com/media/en/technical-documentation/data-sheets/hmc472a.pdf?src-supplier=Avnet+Asia, ComponentLink3Description=http://www.farnell.com/datasheets/1868224.pdf?src-supplier=Element14, ComponentLink3URL=http://www.farnell.com/datasheets/1868224.pdf?src-supplier=Element14, ComponentLink4Description=https://www.hittite.com/content/documents/data_sheet/hmc472alp4.pdf?src-supplier=Avnet, ComponentLink4URL=https://www.hittite.com/content/documents/data_sheet/hmc472alp4.pdf?src-supplier=Avnet, ComponentLink5Description=https://www.analog.com/media/en/technical-documentation/data-sheets/hmc472a.pdf?src-supplier=Digi-Key, ComponentLink5URL=https://www.analog.com/media/en/technical-documentation/data-sheets/hmc472a.pdf?src-supplier=Digi-Key, Contact Plating=Tin,Matte, Impedance=50R, Insertion Loss=3dB, Lead Free="Contains Lead", Manufacturer Part Number=HMC472ALP4E, Max Supply Voltage=5.5V, Min Supply Voltage=4.5V, Mount="Surface Mount", Number of Bits=6, Number of Channels=1, Number of Pins=24, Packaging="Cut Tape", Pricing 1="1 = 7,47000, 10 = 6,84400, 25 = 6,22160, 100 = 5,59940, 250 = 5,13284, 500 = 4,66620, 1000 = 4,19958 (USD)", REACH SVHC="No SVHC", RoHS=Yes, Stock 1=867, Supplier 1=Digi-Key
U23: "IC TRNSLTR BIDIRECTIONAL 16UQFN", High Level Output Current=-20uA, Low Level Output Current=20uA, Manufacturer 1="Texas Instruments", Max Operating Temperature=85°C, Max Supply Voltage=3.6V, Min Operating Temperature=-40°C, Min Supply Voltage=900mV, Nominal Supply Current=5uA, Package Quantity=1, Quiescent Current=10uA, Supplier Part Number 1=296-29681-1-ND, ComponentLink1Description=https://datasheet.ciiva.com/1900/txb0304-1900817.pdf?src-supplier=Digi-Key, ComponentLink1URL=https://datasheet.ciiva.com/1900/txb0304-1900817.pdf?src-supplier=Digi-Key, ComponentLink2Description=https://datasheet.ciiva.com/15096/getdatasheetpartid-490462-15096317.pdf?src-supplier=Verical, ComponentLink2URL=https://datasheet.ciiva.com/15096/getdatasheetpartid-490462-15096317.pdf?src-supplier=Verical, ComponentLink3Description=https://datasheet.ciiva.com/1900/txb0304-1900818.pdf?src-supplier=Digi-Key, ComponentLink3URL=https://datasheet.ciiva.com/1900/txb0304-1900818.pdf?src-supplier=Digi-Key, ComponentLink4Description=https://datasheet.ciiva.com/1900/txb0304-1900819.pdf?src-supplier=Digi-Key, ComponentLink4URL=https://datasheet.ciiva.com/1900/txb0304-1900819.pdf?src-supplier=Digi-Key, ComponentLink5Description=https://datasheet.ciiva.com/14287/txb0304-14287243.pdf?src-supplier=Avnet, ComponentLink5URL=https://datasheet.ciiva.com/14287/txb0304-14287243.pdf?src-supplier=Avnet, Contact Plating=Gold, Data Rate=140Mbps, Lead Free="Lead Free", Logic Function=Translator, Manufacturer Part Number 1=TXB0304RSVR, Mount="Surface Mount", Number of Bits=4, Number of Channels=4, Number of Inputs=4, Number of Outputs=4, Number of Pins=16, Packaging="Tape and Reel", Pricing 1="1=1.45000, 10=1.29700, 100=1.01160, 500=0.83564, 1000=0.65972 (USD)", Propagation Delay=4.8ns, Radiation Hardening=No, REACH SVHC="No SVHC", RoHS=Yes, Stock 1=1758, Supplier 1=Digi-Key, Turn-On Delay Time=18.9ns
X1: "OSC VCXO 122.88MHZ LVPECL SMD", Case/Package=SMD/SMT, Frequency=122.88MHz, Manufacturer=Epson, Max Operating Temperature=85°C, Max Supply Current=65mA, Min Operating Temperature=-40°C, Supplier Part Number 1=SER3907CT-ND, ComponentLink1Description=https://datasheet.ciiva.com/29626/vg-4513ca-partnumber-29626986.pdf?src-supplier=Digi-Key, ComponentLink1URL=https://datasheet.ciiva.com/29626/vg-4513ca-partnumber-29626986.pdf?src-supplier=Digi-Key, ComponentLink2Description=https://datasheet.ciiva.com/29626/vg-4513ca-partnumber-29626987.pdf?src-supplier=Digi-Key, ComponentLink2URL=https://datasheet.ciiva.com/29626/vg-4513ca-partnumber-29626987.pdf?src-supplier=Digi-Key, ComponentLink3Description=https://datasheet.ciiva.com/29626/076-vg-4513ca-cb-e13ya-29626988.pdf?src-supplier=Digi-Key, ComponentLink3URL=https://datasheet.ciiva.com/29626/076-vg-4513ca-cb-e13ya-29626988.pdf?src-supplier=Digi-Key, Height=0.071inch, Lead Free="Lead Free", Length=0.276inch, Manufacturer Part Number=VG-4513CA122.8800M-GFCT3, Mount="Surface Mount", Packaging="Tape and Reel", Pricing 1="1 = 9,91000, 10 = 9,29000, 50 = 8,97980, 100 = 8,67020 (USD)", RoHS=Yes, Stock 1=438, Supplier 1=Digi-Key, Width=0.197inch

## Free pads (board coordinates)
  oval 4.1x5.5 hole 2.1 slot 4 at 90 deg unplated: ""(4,45) ""(4,75) ""(66,45) ""(66,75)

## Via types
v1: diameter 0.5, hole 0.2, TopLayer to Bottom Layer, tented both sides, 402 vias
v2: diameter 0.45, hole 0.15, TopLayer to Bottom Layer, tented both sides, 189 vias
v3: diameter 0.45, hole 0.15, TopLayer to Bottom Layer, 23 vias
v4: diameter 0.5, hole 0.2, TopLayer to Bottom Layer, 1 vias

## Nets (pads, with @x,y where several pads share a name; then routed paths per layer and width w, separated by ;. In a path a pad name is that pad's centre, name@x,y a point inside that pad or via, vN(x,y) a via of type N, cw(c..) or ccw(c..) an arc to the next point about the centre after c; other vN are vias at no path point)
0F_N: J7.2 R17.1 U6.41 | length 16.7
  Bottom Layer w0.268: J7.2@29.94,37.8 cw(c29.94,37.304) 30.436,37.304 30.436,34.863 cw(c30.375,34.863) R17.1@30.375,34.802 cw(c30.375,34.754) 30.423,34.754 30.423,32.545 cw(c30.085,32.545) 30.085,32.207 ccw(c30.085,31.052) 28.93,31.052 28.93,29.505 ccw(c30.513,29.505) 30.513,27.922 U6.41@35.217,27.922
0F_P: J8.2 R17.2 U6.42 | length 15.9
  Bottom Layer w0.268: J8.2@31.563,37.8 ccw(c31.563,37.201) 30.964,37.201 30.964,34.863 ccw(c31.025,34.863) R17.2@31.025,34.802 ccw(c31.025,34.727) 30.951,34.727 30.951,32.545 cw(c30.085,32.545) 30.085,31.679 ccw(c30.085,31.052) 29.458,31.052 29.458,29.505 ccw(c30.513,29.505) 30.513,28.45 U6.42@35.217,28.45
3V3_DIGIT: C9.2 C11.1 C12.2 C67.2 C68.2 FB1.2 R10.1 R11.1 R49.2 R57.1 R58.1 R59.1 R64.1 R67.1 R68.1 R69.1 R86.1 R88.1 R107.2 R124.2 U7.5 U8.5 U9.7 U12.5 U12.7 | length 207.8
  TopLayer w0.25: C9.2@7.134,29.095 7.134,28.397 7.636,27.896 FB1.2@7.636,27.846 7.339,27.548 R124.2@7.339,26.475 ; v2(23.1,29.8) 23.1,29.751 23.66,29.19 23.66,28.891 C67.2@23.675,28.876 ; R107.2@26.383,7.928 26.383,8.621 26.039,8.965 26.039,9.965 26.654,10.58 v1(26.654,10.6)
  TopLayer w0.3: C68.2@9.576,50.154 10.036,50.154 10.477,50.595 11.084,50.595 U7.5@11.117,50.627 ; R69.1@16.032,27.892 17.162,27.892 R67.1@18.351,27.892 ; U8.5@23.66,27.779 23.668,27.787 23.668,28.868 C67.2@23.675,28.876
  TopLayer w0.5: C68.2@9.576,50.264 8.31,50.264 8.017,49.971 8.017,48.783 v2(12.587,44.212) ; v2(16.916,28.848) 17.162,28.603 R68.1@17.162,27.942 R68.1@17.162,27.892 ; v2(18.046,44) 18.046,44.934 18.339,45.227 R59.1@20.596,45.227
  Layer 2 w0.25: v2(16.916,28.848) 19.877,28.848 20.828,29.8 v2(23.1,29.8) ; v1(26.654,10.6) 26.657,10.597 29.179,10.597 29.289,10.487 ; v1(46.547,73.6) 48.7,73.6 49.1,73.2 49.1,71.519 48.8,71.219 ; v1(48.797,68.465) 48.797,71.219
  Layer 2 w0.5: v2(19.61,13.183) 19.812,12.981 24.155,12.981 24.959,13.785 28.646,13.785 28.649,13.788 29.179,13.258 29.179,10.597 ; 29.289,10.487 30.527,9.249 32.417,9.249 32.744,8.922 35.814,8.922 36.698,9.806 38.083,9.806 39.631,11.354 40.861,11.354 41.615,10.6 42.302,10.6 42.887,10.015 44.891,10.015 45.972,8.934 v1(45.972,8.632) ; v1(32.034,74.4) 38.6,74.4 39.4,73.6 v1(46.547,73.6)
  Layer 3 w0.5: v2(16.916,28.848) 15.575,27.507 v4@6.553,27.507 ; v2(19.61,13.183) 19.06,13.733 19.06,20.207 v2(18.227,21.04) v2(16.674,21.04) 16.322,21.392 8.352,21.392 6.05,23.693 6.05,27.003 v4@6.553,27.507 ; v1(48.797,68.465) 48.797,65.518 47.237,63.958 35.558,63.958 32.243,60.643 32.243,53.758 22.485,44 v2(18.046,44) 12.799,44 v2(12.587,44.212) 11.8,43.425 11.8,38.34 9.332,35.871 9.332,30.285 v4@6.553,27.507
  Bottom Layer w0.25: U12.5@46.047,72.757 C12.2@46.047,73.6 v1(46.547,73.6) C11.1@47.047,73.6 U12.7@47.047,72.757 ; R88.1@48.516,66.281 48.516,66.863 48.797,67.143 R49.2@48.797,67.593 v1(48.797,68.465)
  Bottom Layer w0.5: v2(16.674,21.04) 16.711,21.003 R10.1@16.711,20.039 ; v2(18.227,21.04) 18.227,20.081 18.288,20.019 R11.1@18.257,19.989 ; R86.1@31.7,75.3 31.7,74.734 v1(32.034,74.4) ; v1(45.972,8.632) 46.239,8.366 R64.1@46.981,8.366
  other v4: 6.528,27.507
3V3_MB: C14.1 C70.1 C153.2 C154.2 P1.11 R8.1 R63.2 R65.2 R66.2 R75.1 R76.2 R110.1 R111.1 R112.2 R113.2 U4.6 U9.2 U10.6 U10.14 U10.15 U10.16 U11.6 U11.14 U11.15 U11.16 U17.8 U23.16 | length 120.5
  TopLayer w0.25: R75.1@32.61,17.689 32.61,18.285 v1(33.179,18.854) 33.677,18.357 33.677,17.951 33.838,17.789 34.252,17.789 U23.16@34.277,17.764 ; 34.639,10.118 34.778,9.979 U11.16@35.5,9.979 ; U11.6@37.9,10.379 39.473,10.379 39.673,10.178 v3(39.727,10.178) ; C70.1@40.287,9.65 40.297,9.65 40.322,9.675 40.322,9.68 40.62,9.979 U10.16@41.095,9.979 ; U10.14@41.095,10.779 42.288,10.779 42.688,10.379 U10.6@43.495,10.379
  TopLayer w0.3: C153.2@17.323,9.107 18.102,9.107 18.316,8.893 18.316,8.594 U4.6@18.827,8.594 20.111,8.594 20.155,8.638 v1(20.209,8.638)
  TopLayer w0.5: v3(23.465,11.069) 24.224,11.829 v2(24.224,14.148)
  TopLayer w0.6: v1(26.579,4.655) 26.579,4.093 27.2,3.472 P1.11@27.2,1.4
  Layer 2 w0.5: v1(12.725,31.953) 12.725,19.068 17.875,13.918 21.594,13.918 22.195,14.52 23.91,14.52 24.224,14.206 v2(24.224,14.148)
  Layer 3 w0.5: v1(26.579,4.655) 27.995,6.071 31.333,6.071 33.979,8.717 v1(33.979,10.154) 34.143,9.99 39.539,9.99 v3(39.727,10.178) 38.184,11.721 38.184,16.742 37.731,17.196 34.764,17.196 33.179,18.78 v1(33.179,18.854)
  Bottom Layer w0.2: U9.2@22.514,13.131 23.428,13.131
  Bottom Layer w0.25: 23.428,13.131 23.952,13.656 23.952,13.855 24.224,14.127 v2(24.224,14.148) 25.656,14.148 26.875,12.928 R8.1@27.966,12.928
  Bottom Layer w0.3: U17.8@14.637,35.374 15.112,35.374 15.605,34.88 R112.2@16.161,34.88